# Altium PCB ControlBoard_PCB.PcbDoc (part 2 of 2)
Units mil, origin at the board's own origin, x right, y up, seen from the top; angles counter-clockwise.
Board outline 1629.92 x 1653.54 mil, 2 copper layers (Top Layer, Bottom Layer), stack 57 mil thick; 87 components, 76 nets, 349 pads, 144 vias.
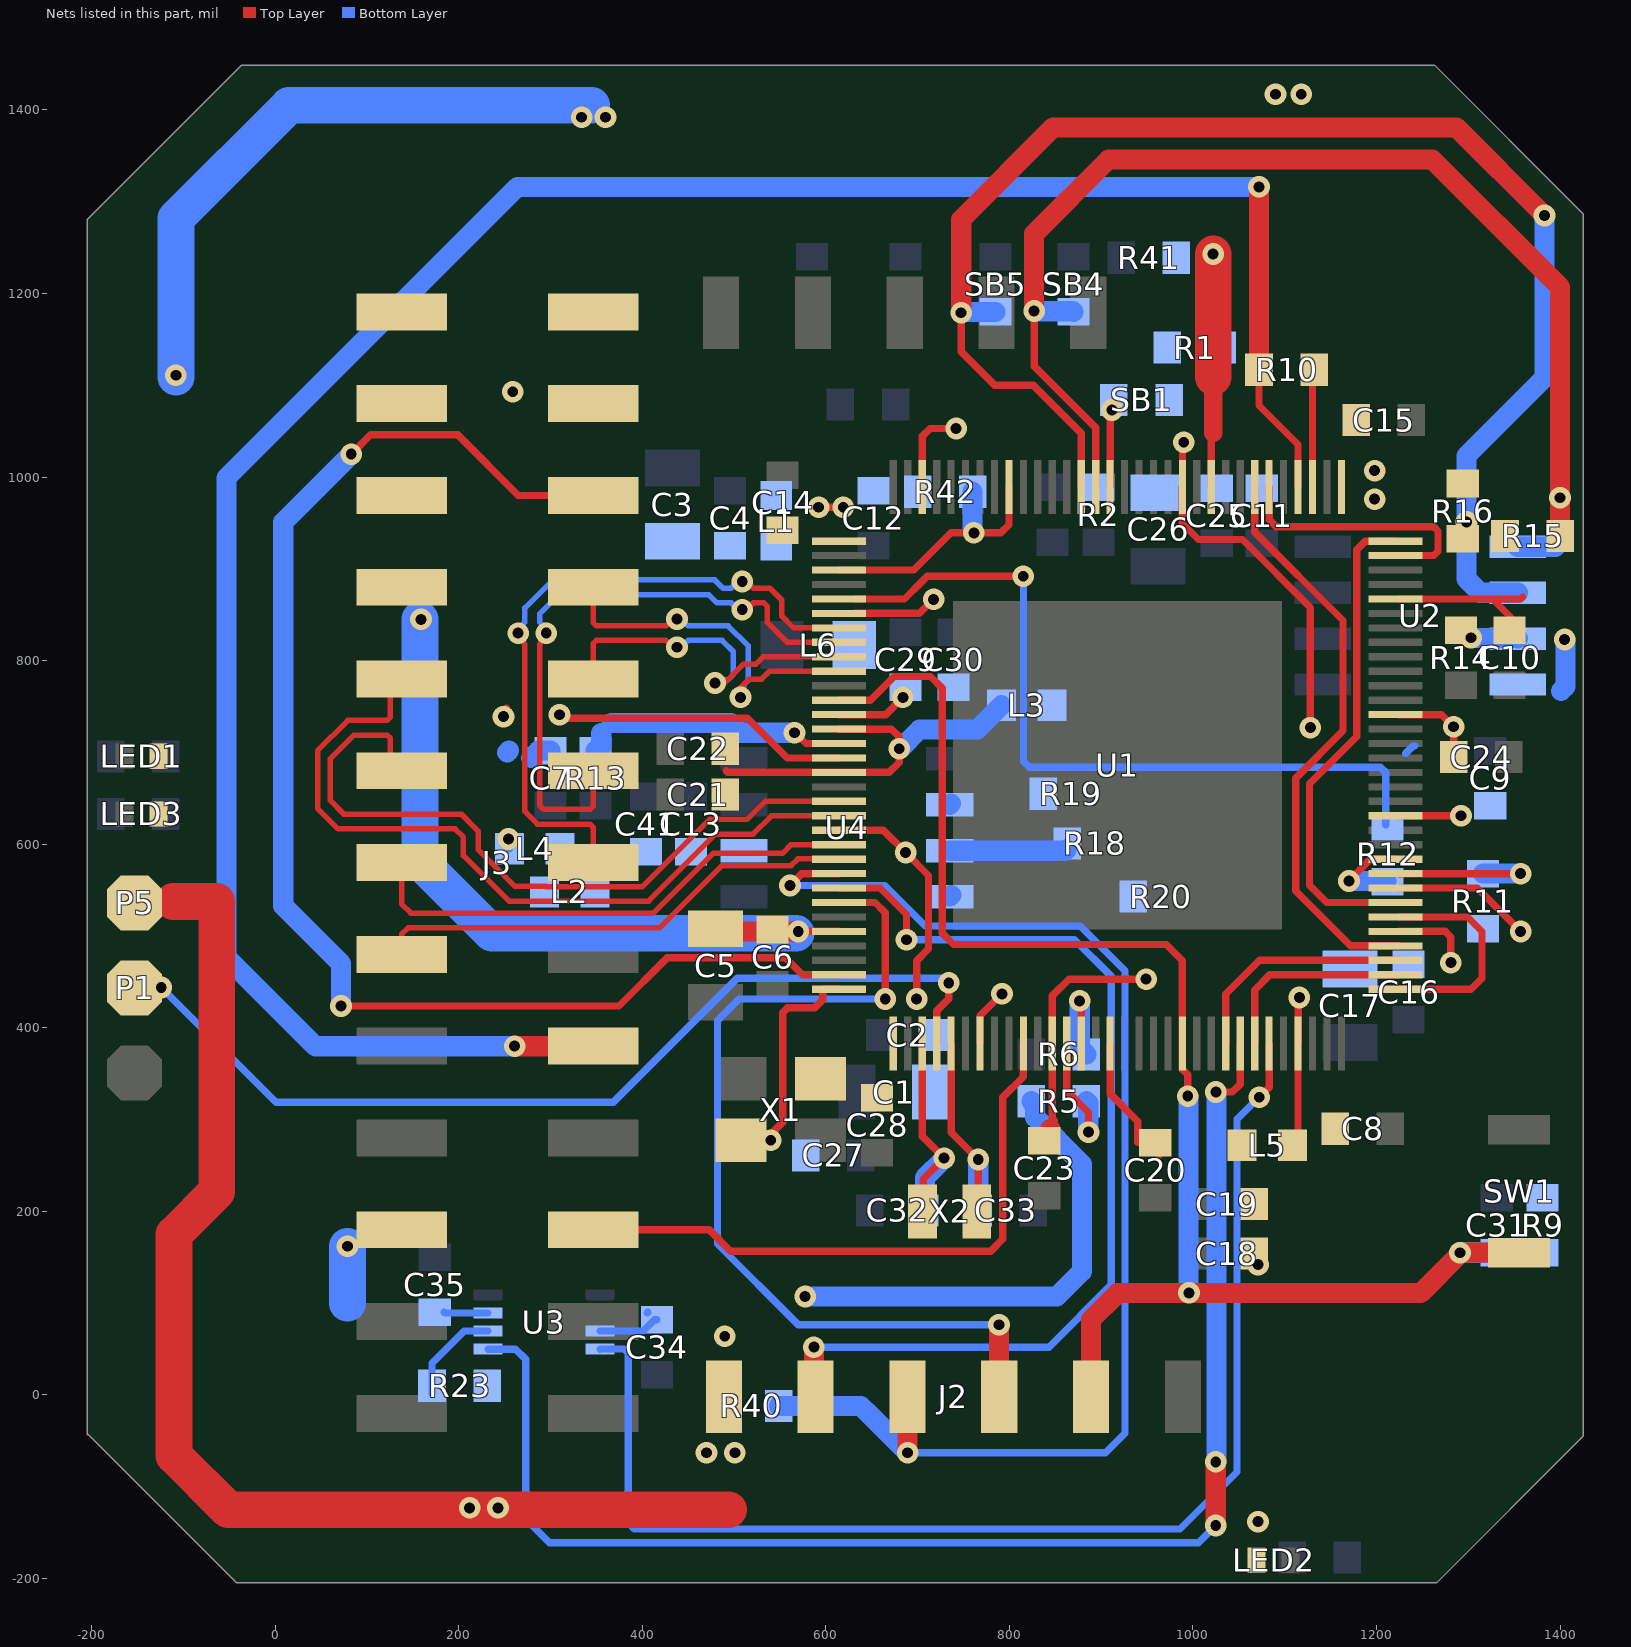
[diagram p2: the nets of this part, all layers, seen from the top]

## Via types
v1: diameter 23.62, hole 11.81, Top Layer to Bottom Layer, tented both sides, 131 vias
v2: diameter 23.62, hole 11.81, Top Layer to Bottom Layer, 9 vias
v3: diameter 125.98, hole 125.98, Top Layer to Bottom Layer, 4 vias

## Nets (pads, with @x,y where several pads share a name; then routed paths per layer and width w, separated by ;. In a path a pad name is that pad's centre, name@x,y a point inside that pad or via, vN(x,y) a via of type N, cw(c..) or ccw(c..) an arc to the next point about the centre after c; other vN are vias at no path point) (continued)
NetP1_1: P1.1 U1.4 | length 1068.6
  Top Layer w8: U1.4@720.82,382.97 720.82,418.57 734,431.76 v1(734,449)
  Top Layer w22: P1.1@-153,443.5 -152.5,444 v1(-124,444)
  Bottom Layer w8: v1(-124,444) 1,319 368.34,319 503.46,454.12 728.88,454.12 v1(734,449)
NetR1_2: R1.2 SB1.2
NetR2_2: R2.2 SB1.1 U1.81 | length 84.5
  Top Layer w8: U1.81@909.86,989.33 909.86,1071.09 v1(911.76,1073)
NetR5_2: R5.2 U1.13 | length 140.9
  Top Layer w8: U1.13@862.55,382.97 862.55,331.45 886.19,307.81 v1(886.19,286.38)
  Bottom Layer w22: R5.2@884,320 885.88,318.12 885.88,286.69 v1(886.19,286.38)
NetR6_2: R6.2 U1.14 | length 113.7
  Top Layer w8: v1@876.62,434.38 878.24,432.76 878.24,383.03 U1.14@878.3,382.97
  Bottom Layer w22: v1@876.7,429.3 v1(876.62,429.38) 876.62,378.38 R6.2@884,371
NetR11_2: R11.2 U1.40 | length 863.9
  Top Layer w8: U1.40@1224.76,552.26 1309.74,552.26 ; v1(1356.99,505) 1309.74,552.26 ; U1.40@1238.54,552.26 1309.74,552.26 ; U1.40@1238.54,552.26 1309.74,552.26 ; U1.40@1238.54,552.26 1309.74,552.26 ; U1.40@1238.54,552.26 1309.74,552.26 ; U1.40@1238.54,552.26 1309.74,552.26 ; U1.40@1238.54,552.26 1309.74,552.26 ; U1.40@1238.54,552.26 1309.74,552.26 ; U1.40@1238.54,552.26 1309.74,552.26 ; U1.40@1238.54,552.26 1309.74,552.26 ; U1.40@1238.54,552.26 1309.74,552.26
NetR12_2: R12.2 U1.42 | length 103.4
  Top Layer w8: v1(1170,560) 1170,560.55 1193.2,583.76 U1.42@1220.82,583.76
  Bottom Layer w8: R12.2@1211,560 R12.2@1212,559
  Bottom Layer w22: v1(1170,560) R12.2@1211,560
NetR13_2: R13.2 U1.111 | length 280.3
  Top Layer w8: v1(566,721.42) 566.82,721.42 578.5,709.74 U1.111@614.52,709.74
  Bottom Layer w22: R13.2@349,702 351.5,702 355.5,706 355.5,720.96 ; 366.54,732 496.84,732 507.42,721.42 v1(566,721.42)
NetR14_2: R14.2 U2.7 | length 51.4
  Bottom Layer w22: v1(1303,825) 1303.31,824.69 1353.31,824.69 U2.7@1354,824
NetR18_1: R18.1 U4.3 | length 127.4
  Bottom Layer w22: U4.3@735.01,593 861,593 R18.1@862,594
NetR19_1: R19.1 U4.2 | length 1.8
  Bottom Layer w22: U4.2@735.01,643 U4.2@736.25,644.24
NetR20_1: R20.1 U4.4 | length 2.5
  Bottom Layer w22: U4.4@735.01,543 U4.4@736.8,544.8
NetR23_2: R23.2 U3.6 | length 109.1
  Bottom Layer w8: R23.2@171,1 R23.2@171,10 171,34.55 206.08,69.63 U3.6@232,69.63
NetU1_39: U1.39 U1.64 | length 534.8
  Top Layer w8: U1.39@1220.82,536.51 1145.7,536.51 1127,555.21 1127,665.79 1178.54,717.33 1178.54,920.94 1187.75,930.15 U1.64@1220.82,930.21 U1.64@1220.82,930.21
NetU1_63: U1.63 U1.70 | length 290.9
  Top Layer w8: U1.70@1083.02,989.27 1083.02,953.72 1090.74,946 1262.31,946 1267,941.31 1267,919.21 1262.31,914.53 U1.63@1224.82,914.53
OPTO_IN: J3.6 U1.127 | length 1529.8
  Top Layer w8: v1(71.81,423.81) 374.81,423.81 427.47,476.47 556.08,476.47 574.72,457.83 614.46,457.83 U1.127@614.52,457.77 ; v1(83,1025) 104,1046 199,1046 265,980 J3.6@346.66,980
  Bottom Layer w22: v1(71.81,423.81) 71.81,470.19 9,533 9,951 v1(83,1025)
PHY_IRQn: R42.2 U1.88 U1.99 | length 292.1
  Top Layer w8: U1.99@614.52,898.72 695.98,898.72 736.49,939.23 v1(761.39,939.23) 790.79,939.23 799.56,948 U1.88@799.56,989.27
  Bottom Layer w22: R42.2@760,984 760,941.05 761.39,939.67 v1(761.39,939.23)
QSPI_CLK: R11.1 U1.41 | length 1357.8
  Top Layer w8: U1.41@1224.76,568.01 v1(1356.99,568.01) ; U1.41@1238.54,568.01 v1(1356.99,568.01) ; U1.41@1238.54,568.01 v1(1356.99,568.01) ; U1.41@1238.54,568.01 v1(1356.99,568.01) ; U1.41@1238.54,568.01 v1(1356.99,568.01) ; U1.41@1238.54,568.01 v1(1356.99,568.01) ; U1.41@1238.54,568.01 v1(1356.99,568.01) ; U1.41@1238.54,568.01 v1(1356.99,568.01) ; U1.41@1238.54,568.01 v1(1356.99,568.01) ; U1.41@1238.54,568.01 v1(1356.99,568.01) ; U1.41@1238.54,568.01 v1(1356.99,568.01)
  Bottom Layer w22: R11.1@1316,568 v1(1356.99,568.01)
QSPI_CS: R12.1 U1.101 | length 905
  Top Layer w8: v1(815.11,891.89) 710.36,891.89 705.66,887.19 685.69,867.22 ; 685.69,867.22 632.24,867.22 685.69,867.22
  Bottom Layer w8: v1(815.11,891.89) 815.5,891.5 815.5,690.44 821.94,684 1204.31,684 1210,678.31 R12.1@1210,621
QSPI_SIO0: U1.33 U1.38 | length 243
  Top Layer w8: U1.33@1224.76,442.02 1303.02,442.02 1315,454 1315,505 1299.24,520.76 U1.38@1224.76,520.76
QSPI_SIO1: U1.26 U1.34 | length 222.6
  Top Layer w8: U1.26@1067.28,382.97 1067.28,441.28 1083.77,457.77 U1.34@1220.82,457.77 U1.34@1224.76,457.77
QSPI_SIO2: U1.24 U1.35 | length 258
  Top Layer w8: U1.24@1035.78,382.97 1035.78,436.78 1072.52,473.52 U1.35@1220.82,473.52 U1.35@1224.76,473.52
QSPI_SIO3: U1.36 U1.71 | length 667
  Top Layer w8: U1.71@1067.34,961.31 1067.34,989.2 U1.71@1067.28,989.27 1067.28,939.94 1163.54,843.67 1163.54,723.54 1112,672 1112,549 1171.73,489.27 U1.36@1220.82,489.27 U1.36@1224.76,489.27
RST: C31.1 J2.5 R9.1 SW1.1 U1.21 U1.108 | length 1654.5
  Top Layer w8: U1.108@614.52,756.98 648.72,756.98 674.55,782.81 714.19,782.81 727,770 727,503 739.19,490.81 971.1,490.81 988.54,473.38 U1.21@988.54,382.97 988.54,355.04 994.38,349.19 v1(994.38,325.56)
  Top Layer w22: J2.5@889,-2 889,82 918,111 v1@995.62,111 ; v1(995.81,111.19) v1@995.62,111 ; v1@1291.5,154.5 1248,111 v1@995.62,111 ; v1@1292.1,155.1 SW1.1@1355.28,155.1
  Bottom Layer w22: v1(994.38,325.56) 995.19,324.74 995.19,111.81 v1(995.81,111.19) ; v1(1291,155) C31.1@1331,155
RXA_N: J3.14 U1.103 | length 740.8
  Top Layer w6: v2(264.88,830) 264.88,825.23 272.19,817.92 272.19,635.7 285.89,622 343.15,622 346.66,618.49 J3.14@346.66,580 ; v2(509,886.19) 513.77,886.19 521.08,878.88 539.16,878.88 552.05,865.99 552.05,848.58 564.9,835.72 U1.103@614.52,835.72
  Bottom Layer w6: v2(264.88,830) 264.88,834.77 272.19,842.08 272.19,857.44 302.75,888 479.07,888 488.19,878.88 496.92,878.88 504.23,886.19 v2(509,886.19)
RXA_P: J3.12 U1.104 | length 687.7
  Top Layer w6: v2(295.5,830) 295.5,825.23 288.19,817.92 288.19,642.33 292.51,638 343.15,638 346.66,641.51 J3.12@346.66,680 ; v2(509,855.57) 513.77,855.57 521.08,862.88 532.53,862.88 536.05,859.36 536.05,841.95 558.02,819.98 U1.104@614.52,819.98
  Bottom Layer w6: v2(295.5,830) 295.5,834.77 288.19,842.08 288.19,850.81 309.38,872 472.44,872 481.56,862.88 496.92,862.88 504.23,855.57 v2(509,855.57)
RXB_N: J3.15 U1.119 | length 534.7
  Top Layer w6: J3.15@138,480 138,502 144.98,508.98 286.36,508.98 ; 288.34,508.92 cw(c288.34,537.92) 286.37,508.99 ; U1.119@614.52,583.76 614.18,584.09 569.64,584.09 562.35,576.81 486.82,576.81 418.93,508.92 286.37,508.99
RXB_P: J3.13 U1.118 | length 556.6
  Top Layer w6: J3.13@138,580 138,535 148.08,524.92 412.31,524.92 477.38,590 552.92,590 562.42,599.5 U1.118@614.52,599.5
SCL_: R16.1 SB5.1 U1.83 U2.6 | length 1618.2
  Top Layer w8: v1(747.5,1179) 747.5,1136.5 784,1100 826,1100 878.36,1047.64 U1.83@878.36,989.33
  Top Layer w22: v1(747.5,1179) 747.5,1280.66 847.84,1381 1287,1381 v1(1383,1285)
  Bottom Layer w22: v1(747.5,1179) 748,1179 749,1180 SB5.1@785,1180 ; U2.6@1354,874 1313.09,874 1298,889.09 v1(1298,951) 1298,1023 1383,1108 v1(1383,1285)
SDA_: R15.1 SB4.1 U1.82 U2.5 | length 1378.5
  Top Layer w8: v1(827,1181) 827,1120.74 894.05,1053.69 U1.82@894.05,989.39
  Top Layer w22: v1(827,1181) 827,1265 908,1346 1260.84,1346 1400,1206.84 v1(1400,977.56) R15.1@1400,936
  Bottom Layer w22: v1(827,1181) 827.31,1180.69 869.31,1180.69 SB4.1@870,1180 ; U2.5@1354,924 1395,924 1400,929 v1(1400,977.56)
STEP: J3.22 U1.10 | length 683.7
  Top Layer w8: J3.22@346.66,180 473,180 496.27,156.73 779.73,156.73 793,170 793,324.21 815.24,346.46 815.24,382.91 U1.10@815.31,382.97
SWDCLK: J2.3 R40.2 U1.120 | length 1434.4
  Top Layer w8: v1(561,555) 574.01,568.01 U1.120@614.52,568.01 U1.120@614.58,568.07
  Top Layer w22: J2.3@689,-2 689.19,-2.19 v1(689.19,-62.99)
  Bottom Layer w8: v1(561,555) 664.26,555 708.26,511 877.21,511 926,462.21 926,-41.72 904.73,-62.99 v1(689.19,-62.99)
  Bottom Layer w22: R40.2@549,-12 638.19,-12 647.86,-21.67 680.35,-54.16 v1(689.19,-62.99)
SWDIO: J2.2 U1.121 | length 1095.3
  Top Layer w8: U1.121@614.52,552.26 659.11,552.26 688,523.37 v1(688,496)
  Top Layer w22: v1@587.34,52.12 587.34,-0.34 J2.2@589,-2
  Bottom Layer w8: v1(587.03,52.12) 843.18,52.12 911,119.94 911,456 871,496 v1(688,496)
SWO: J2.4 U1.122 | length 1004.4
  Top Layer w8: U1.122@614.52,536.51 653.64,536.51 664.86,525.29 v1(664.86,431.31)
  Top Layer w22: v1@788.9,76.38 788.9,-1.9 J2.4@789,-2
  Bottom Layer w8: v1@662.86,431.31 505.75,431.31 482,407.56 482,164.52 570.03,76.49 v1(788.79,76.49)
TXA_N: J3.10 U1.105 | length 399.4
  Top Layer w6: J3.10@346.66,780 346.66,818.49 350.18,822 425.92,822 433.23,814.69 v2(438,814.69) ; v2(479.33,775.67) 480.66,777 491,777 509.87,795.87 523.51,795.87 532,804.35 614.39,804.35 U1.105@614.52,804.23
  Bottom Layer w6: v2(438,814.69) 442.77,814.69 450.08,822 487,822 499.31,809.69 499.31,794.93 499.34,785.09 493.29,779.04 482.7,779.04 v2(479.33,775.67)
TXA_P: J3.8 U1.106 | length 412.7
  Top Layer w6: J3.8@346.66,880 346.66,841.51 350.18,838 425.92,838 433.23,845.31 v2(438,845.31) ; v2(507.07,760) 507.07,760.93 502.31,765.69 516.5,779.87 530.14,779.87 538.75,788.48 U1.106@614.52,788.48
  Bottom Layer w6: v2(438,845.31) 442.77,845.31 450.08,838 493.63,838 515.31,816.31 515.31,801.55 ; v2(507.07,760) 510.44,763.37 510.44,773.57 515.34,778.47 515.34,801.53
TXB_N: J3.11 U1.115 | length 807.2
  Top Layer w6: J3.11@138,680 125.69,692.31 125.69,715.49 122.17,719 86,719 60,693 60,648 75.31,632.69 202.94,632.69 221.31,614.31 221.31,594.31 261.64,553.99 294.9,553.99 294.96,553.92 400.29,553.92 473.37,627 514.14,627 533.89,646.75 U1.115@614.52,646.75
TXB_P: J3.9 U1.116 | length 864.4
  Top Layer w6: J3.9@138,780 125.69,767.69 125.69,738.51 122.17,735 79.37,735 46.31,701.94 46.31,639.06 68.69,616.69 196.31,616.69 205.31,607.69 205.31,587.69 255.01,537.99 304.02,537.99 304.08,537.92 406.92,537.92 480,611 520.77,611 540.77,631 U1.116@614.52,631
UART_IO: J3.18 R10.2 U1.68 | length 2562.5
  Top Layer w8: R10.2@1072,1117 1072,1078 1114.52,1035.48 U1.68@1114.52,989.27
  Top Layer w22: v1(261,380) J3.18@346.66,380 ; R10.2@1072,1117 v1(1072,1316.19)
  Bottom Layer w22: v1(261,380) 44,380 -53,477 -53,999 264,1316 v1@1071.81,1316
UART_IO#: R10.1 U1.67 | length 128.4
  Top Layer w8: U1.67@1130.27,989.27 1130.27,1115.27 R10.1@1132,1117
UART_RX: U1.27 U3.4 | length 1390.8
  Top Layer w8: v1(1072.19,324.42) 1083.02,335.26 U1.27@1083.02,382.97
  Bottom Layer w8: U3.4@354.05,49.94 U3.4@354.05,49.94 380.31,50 385,45.31 385,-139.56 391.44,-146 986,-146 1048,-84 1048,300.48 1071.94,324.42 v1(1072.19,324.42)
UART_TX: U1.25 U3.5 | length 1537.2
  Top Layer w8: v1(1025,330) 1043,330 1051.53,338.53 U1.25@1051.53,382.97
  Top Layer w22: v1(1024.87,-142.21) v1(1024.87,-72.87)
  Bottom Layer w8: U3.5@232,49.94 262.06,49.94 273,39 273,-135 299,-161 1006.08,-161 v1(1024.87,-142.21)
  Bottom Layer w22: v1(1024.87,-72.87) 1025.62,-72.12 1025.62,329.38 v1(1025,330)
VCC_3V3: C1.1 C2.1 C8.1 C9.1 C10.1 C11.1 C12.1 C13.1 C14.1 C15.1 C16.1 C17.1 C18.1 C34.1 C41.1 J2.1 J3.2 J3.4 L1.1 L2.1 L4.1 L5.1 LED1.1 LED2.1 LED3.1 P5.1 R1.1 R5.1 R9.2 R15.2 R16.2 R23.1 R40.1 R41.2 R42.1 U1.7 U1.29 U1.37 U1.45 U1.60 U1.65 U1.74 U1.94 U1.97 U1.117 U2.8 U3.3 U4.6 | length 3808.5
  Top Layer w8: v1(592.19,967.19) v1(619,967.19) v1@619,971 ; U1.117@614.52,615.25 662.75,615.25 v1(687,591) 712,566 712,486 699,473 v1(699,431.31) ; U1.94@705.07,989.27 705.07,1044.31 713.76,1053 v1(742,1053) ; U1.7@768.06,382.97 768.06,413.06 v1(792,437) ; U1.74@1020.03,989.27 1020.03,1046.03 1022,1048 ; v1@1067,-141 v1@1067,-139 ; L5.1@1108.56,272 1114.52,277.96 U1.29@1114.52,382.97 1114.58,383.03 1114.58,431.58 v1(1116,433) v1@1116.49,432.51 ; U1.37@1224.76,505.02 1274.98,505.02 1281,499 v1(1281,471) ; U1.45@1224.76,631 v1(1292,631) ; U1.60@1224.76,867.22 1357.22,867.22 1359,869 ; 1328.5,865 C10.1@1346,847.5
  Top Layer w20: 1022,1048 1022,1109
  Top Layer w40: -111,537.5 -63.5,537.5 -63.5,221.5 -110,175 -110,-66 -51,-125 494,-125 ; 1022,1109 v1(1022,1243)
  Bottom Layer w8: U3.3@354.05,69.63 401.13,69.63 413.5,82 C34.1@416,82 ; C34.1@405.37,89.32 C34.1@406,89.94
  Bottom Layer w22: R40.1@488.5,-18.5 R40.1@490,-20 ; v1(577.51,107.28) 851.74,107.28 879.13,134.68 879.13,251.28 828,302.41 828,316 R5.1@824,320 ; 1401,767 1406,772 1406,822 v1(1405,823)
  Bottom Layer w40: v1@-108,1109 v1(-108,1111) -108,1282 15,1405 345,1405
  other v1: 1071,-138 212,-123 243,-123 470,-63 501,-63 490,64 1071,142 1198,976 1198,1007 334,1392 360,1392 1090,1417 1118,1417
VDD12: C21.1 C22.1 L3.2 U1.110 U1.113 | length 421.8
  Top Layer w8: 491.5,680 493.26,678.24 U1.113@614.52,678.24 614.58,678.31 669.31,678.31 680,689 v1(680,704) 680,717 671.57,725.43 614.58,725.43 U1.110@614.52,725.49
  Bottom Layer w22: v1(680,704) 681.16,704 702.16,725 765,725 L3.2@791.44,751.44
VDD_5V: C35.1 J3.21 U3.7 | length 110.3
  Bottom Layer w8: C35.1@184,89.94 184.63,89.32 U3.7@232,89.31
  Bottom Layer w40: 79,100 v1(79,162)
VDD_CORE: C29.1 C30.1 L6.2 U1.109 | length 77.3
  Top Layer w8: U1.109@614.52,741.24 665.24,741.24 v1(684,760)
VDD_CR: C23.1 C24.1 C25.1 C26.1 L3.1 U1.12 U1.52 U1.76 | length 772.4
  Top Layer w8: 848.8,299 846.8,301 U1.12@846.8,382.97 846.8,434.8 865,453 v1(949,453) ; v1@990.5,1037.5 v1(990,1038) 988.6,1036.6 988.6,989.33 U1.76@988.54,989.27 988.54,949.46 1006,932 1054,932 1128,858 v1(1128,727) ; U1.52@1224.76,741.24 1270.76,741.24 v1(1284,728) C24.1@1284,695
  Top Layer w22: C23.1@838,277 840.5,277 844.5,281 C23.1@844.5,289.62
  Bottom Layer w8: 1232,699 1240,707 1242,707
VDDANA: C19.1 C20.1 L5.2 U1.16 | length 147.7
  Top Layer w8: U1.16@909.8,382.97 909.8,328.2 940,298 940,275 ; C20.1@953.69,284.31 963,275 C20.1@963,261
VDDBIAS: C7.1 L4.2 U1.112 | length 367.7
  Top Layer w8: v1(249,739) 249,745.19 v1@251.81,748 ; v1@255,601.23 v1@255.44,600.79 ; v1(310,741) 313.81,737.19 514.81,737.19 558.01,693.99 U1.112@614.52,693.99
  Bottom Layer w8: L4.2@255.44,595 L4.2@255.44,600.79
  Bottom Layer w22: 253,700 255,702 ; 279,694 287,702 C7.1@300,702
  other v1: 254.44,605.79
VDDTXRX1: C3.1 C4.1 J3.1 J3.3 L1.2 U1.102 | length 91.7
  Top Layer w8: U1.102@632.24,851.47 702.2,851.47 v1(717.54,866.81)
  other v1: 259,1093
VDDTXRX2: C5.1 C6.1 J3.5 J3.7 L2.2 U1.124 | length 847.8
  Top Layer w8: v1(570.02,505.02) U1.124@614.52,505.02
  Top Layer w22: C5.1@474,508 476.98,505.02 v1(570.02,505.02)
  Bottom Layer w40: v1@158,845 158,581.43 236.43,503 v1@568,503
  other v1: 159,845
XIN32: C32.2 U1.3 X2.1 | length 268.4
  Top Layer w8: U1.3@705.07,382.97 705.07,281.97 v1(729,258.04) 706.29,235.33 706.29,200.82 X2.1@705.47,200
  Bottom Layer w22: C32.2@708,201 708,236.6 729,257.6 v1(729,258.04)
XOUT32: C33.2 U1.5 X2.2 | length 249.7
  Top Layer w8: U1.5@736.57,382.97 736.57,285.98 v1(766.09,256.45) X2.2@766.09,200
  Bottom Layer w22: C33.2@766,202 766.05,202.05 766.05,256.41 v1(766.09,256.45)
XTAL_IN: C27.2 U1.128 X1.1 | length 255.3
  Top Layer w8: X1.1@507.69,277.54 v1(540,277.54) 540,284 553,297 553,416.44 558.56,422 588,422 596.71,430.71 596.71,441.96 596.77,442.02 U1.128@614.52,442.02
XTAL_OUT: C28.2 U1.1 X1.3
pads on no net: U1.8 U1.9 U1.18 U1.19 U1.20 U1.22 U1.23 U1.28 U1.30 U1.31 U1.32 U1.48 U1.49 U1.50 U1.51 U1.53 U1.54 U1.55 U1.56 U1.57 U1.58 U1.59 U1.61 U1.62 U1.66 U1.69 U1.72 U1.73 U1.75 U1.77 U1.78 U1.79 U1.80 U1.84 U1.85 U1.86 U1.87 U1.91 U1.92 U1.93 U1.96 U1.100 U1.107 U1.123 U1.125 U1.126 U4.1 U4.5 U4.8

## Polygon pours and split planes (outlines as drawn)
GND on Bottom Layer "Polygon_2" (hatched 45Degree grid 25 track 15, remove dead copper, pour order 1): -33.5,1344.5 -37.1,1352.9 1265.1,1352.9 1330,1288 1330,-45 1266,-109 -43,-109 -110.5,-41.5 -110.5,1282 -108,1282 -37.1,1352.9
GND on Top Layer "Polygon_1" (hatched 45Degree grid 25 track 15, remove dead copper, pour order 2): -33.5,1344.5 -37.1,1352.9 1265.1,1352.9 1330,1288 1330,-45 1266,-109 -43,-109 -110.5,-41.5 -110.5,1282 -108,1282 -37.1,1352.9

## Other copper
Top Layer:
  rectangle net VDDBIAS: 238,592 262,767
  rectangle net NetP1_1: -183,404 -110.5,476
  rectangle net VCC_3V3: 452.8,82.68 593,122.05
  rectangle net VCC_3V3: -137,657 -82,1285
  rectangle net GND: -65,1218 283,1285
  rectangle net GND: -65,820 64,1260
  rectangle net VDDTXRX1: 89,1057 282,1203
  rectangle net #UART_RX: 258.66,-87 428.66,28
  rectangle net #UART_TX: 258.66,37 428.66,128
  rectangle net VDD_5V: 50,137 220,228
  rectangle net DIAG: 50,237 220,328
  rectangle net LINK1: 50,337 220,402
  rectangle net XTAL_IN: 581,418 644,445
  rectangle net VDDTXRX2: 87,824 198,1000
  rectangle net VCC_3V3: 292,1058 443,1407
  rectangle net GND: 567,249 674,301
  rectangle net VCC_3V3: -137,517 -44,714
  rectangle net VCC_3V3: -199,497 -44,578
  rectangle net GND: -63,-70 220,128
  rectangle net VCC_3V3: 1346,807 1417,896
  rectangle net NetR14_2: 1273,809 1314,850
  rectangle net GND: 1270,754 1413,790
  rectangle net VCC_3V3: 1323,861 1369,985
  rectangle net GND: 1327,632 1413,783
  rectangle net GND: 1378,281 1412,672
  rectangle net VDD12: 473,637 510,723
  rectangle net VCC_3V3: 1276,970 1369,1109
  rectangle net VCC_3V3: 1177,1095 1369,1142
  rectangle net GND: 1327,632 1372,760
  rectangle net GND: 529,431 552,465
  rectangle net XTAL_IN: 480,252 557,301
  rectangle net GND: 478,318 539,358
  rectangle net GND: 435,317 542,465
  rectangle net VCC_3V3: 453,-145 517,104
  rectangle net NetLED1_2: -199,671 -150,744
  rectangle net NetLED3_2: -199,585 -150,658
  rectangle net VCC_3V3: 1050,-198 1085,-124
  rectangle net GND: 1223,957 1269,1085
  rectangle net GND: 504,986 551,1104
  rectangle net GND: 459,1096 551,1237
  rectangle net GND: 504,986 660,1126
  rectangle net VCC_3V3: 410,926 495,1080
  rectangle net GND: 931,-54 1295,90
  rectangle net GND: 413,635 454,722
  rectangle net GND: 1198,196 1412,308
  rectangle net VDDANA: 1040,186 1084,258
  rectangle net VCC_3V3: 1091,129 1182,308
  rectangle net VDD_CR: 819,257 860,305
  rectangle net VCC_3V3: 438,926 644,979
  rectangle net VCC_3V3: 1159,957 1216,1142
  rectangle net VCC_3V3: 1323,807 1369,888
  rectangle net SCL_: 1278,907 1314,962
  rectangle net GND: 820,130 1024,237
  rectangle net VCC_3V3: 1033,129 1106,175
  rectangle net VDDANA: 936,249 1084,302
  rectangle net XTAL_OUT: 567,309 677,411
Bottom Layer:
  rectangle net VDDTXRX1: 593,869 621,942
  rectangle net VDD_CORE: 607,744 756,802
  rectangle net GND: 824,914 913,947
  rectangle net NetR2_2: 894,1062 937,1109
  rectangle net VDDTXRX1: 593,854 730,881
  rectangle net NetR6_2: 854,350 899,395.54
  rectangle net GND: -141,620 -101,652
  rectangle net NetR13_2: 329,683 374,743
  rectangle net VDDBIAS: 238,683 321,761
  rectangle net GND: 248,1200 524,1250
  rectangle net VDDTXRX1: 306,905 621,942
  rectangle net GND: 1169.81,-81 1306,82
  rectangle net RST: 1278,128 1400,172
  rectangle net GND: 1156,1095 1289,1323
  rectangle net NetR19_1: 708,640 853,673
  rectangle net VDD_CR: 826.5,713 1059,792
  rectangle net VDDTXRX2: 256,502 309,565
  rectangle net GND: 190,626 566,673
  rectangle net LINK0: 661,1030 700,1097
  rectangle net VCC_3V3: 684,296 716,442
  rectangle net GND: 1240,748 1308,800
  rectangle net VCC_3V3: 318,1373 1145,1436
  rectangle net GND: 668,810 801,846
  rectangle net VDD_CORE: 606.92,774 658,844
  rectangle net NetL6_1: 527.76,790 598,845
  rectangle net VCC_3V3: 197,-199 1075,-173
  rectangle net VDD_CR: 937,402 1076,507
  rectangle net VDD_CR: 937,492 1265,517.53
  rectangle net VDD_CR: 1237.37,503.47 1265,697
  rectangle net NetR20_1: 709,529 950,557
  rectangle net VCC_3V3: 1091,1243 1145,1428
  rectangle net VCC_3V3: 717,1025 801,1091
  rectangle net VDD_CR: 826.5,695 1299,741
  rectangle net GND: 1306,669 1370,717
  rectangle net VCC_3V3: 1274,598 1393,662
  rectangle net NetR19_1: 708,629 853,658
  rectangle net NetR18_1: 708,579 879,619
  rectangle net GND: 834,822 1279,947
  rectangle net VCC_3V3: 332,530 469,602
  rectangle net GND: 501,316 627,411
  rectangle net GND: 669,130 825,176
  rectangle net GND: 613,130 677,411
  rectangle net GND: 808,130 849,239
  rectangle net GND: 1121,-54 1266,381
  rectangle net VCC_3V3: 708,998 737,1091
  rectangle net VCC_3V3: 753,385 802,448
  rectangle net XTAL_IN: 524,242 597,299
  rectangle net VCC_3V3: 197,-197 258,33
  rectangle net VCC_3V3: 453,-76 514,77
  rectangle net GND: 426,-135 979,-84
  rectangle net GND: 396,-135 441,46
  rectangle net GND: 291,132 421,151
  rectangle net GND: 141,133 421,234
  rectangle net VDD_5V: 59,74 191.63,126
  rectangle net LINK0: 531,1136 605.75,1195
  rectangle net NetLED3_2: -199,581.72 -151,657.72
  rectangle net NetLED1_2: -199,671 -151,747
  rectangle net VCC_3V3: 1084,402 1132,458
  rectangle net VCC_3V3: 1358,184 1393,479
  rectangle net VCC_3V3: 1084,443 1405,485
  rectangle net VCC_3V3: 1380,184 1417,754
  rectangle net VCC_3V3: 1059,-199 1085,174
  rectangle net GND: 1223,884 1279,1323
  rectangle net GND: 598,1059 643,1122
  rectangle net VDDTXRX1: 246,905 373,1110
  rectangle net GND: 389,970 516,1157
  rectangle net VCC_3V3: 773,297 838.94,342
  rectangle net VCC_3V3: 693,297 802,423
  rectangle net VCC_3V3: 281,574 699,612
  rectangle net GND: 1100,748 1279,855
  rectangle net VCC_3V3: 1320,741 1417,786
  rectangle net GND: 1140,184 1351,436
  rectangle net VCC_3V3: 396,58 514,106.3
  rectangle net GND: 383,666 476,714
  rectangle net LINK1: 685,1107 781,1154
  rectangle net LINK1: 664,1107 709,1195
  rectangle net VCC_3V3: 1058,959 1145,1177
  rectangle net VCC_3V3: 960,1220 1135,1295
  rectangle net VCC_3V3: 1010,1121 1145,1292
  region net NetR1_2: 1003,1065 1003,1165 950,1165 950,1065
  rectangle net VDD_CR: 930,959 1045,1049
  rectangle net VCC_3V3: 1058,959 1216,1023
  rectangle net NetR2_2: 876,959 922,1109
  rectangle net NetJ1_1: 847,1218 944,1295
  rectangle net NetJ1_2: 762,1225 807,1295
  rectangle net NetJ1_3: 664,1225 709,1295
  rectangle net NetJ1_4: 562,1225 607,1295
  rectangle net VCC_3V3: 524,955 737,1019
  rectangle net NetR11_2: 1298,492 1372,530

## Silkscreen, mask and mechanical layers (free items; w line width, h text height)
Top Overlay:
  lines w5: 1134,259 1205,259 1221,243 ; 1165.9,259 1169,259
  text "JTAG" at 940,1373 h55
  text "INTERFACING HEADER" at 68,1235 h55
  text "#" at 568,1070 h60 r180
  text "#" at 1120,1044 h60
  text "# >> 0.1uF" at -138,916 h80 r90
  text "#" at 1405,798 h60 r180
  text "#" at 506,774 h60 r180
  text "#" at 1374,674 h60
  text "#" at 506,623 h60 r180
  text "VCC_3V3" at -114,503 h50
  text "NetP1_1" at -114,410.5 h50
  text "#" at 524,380 h60
  text "GND" at -114,318 h50
  text "#" at 1272,310 h60 r180
  text "#" at 824,150 h60
  text "#" at 945,148 h60
  text "SW HEADER" at -10,-191 h55
Bottom Overlay:
  text "#" at 480,1054 h60 r180
  text "#" at 1022,899 h60 r180
  text "#" at 1063,899 h60 r180
  text "#" at 638,897 h60 r180
  text "#" at 799,799 h60
  text "#" at 439,722 h60 r180
  text "#" at 269,627 h60
  text "#" at 1385,627 h60
  text "#" at 413,525 h60
  text "#" at 601,414 h60 r180
  text "#" at 1248,339 h60
  text "#" at 1317,127 h60 r180
  text "#" at 474,97 h60 r180
  text "# >> 0.1uF" at 615,-190 h80
Mechanical 2:
  lines w10: -204.72,-41.8 -204.72,1280.28 ; -204.72,-41.8 -203.18,-43.35 -41.8,-204.72 ; -204.72,-41.8 -204.72,1280.28 ; -204.72,1280.28 -36.18,1448.82 ; -41.8,-204.72 1265.28,-204.72 ; -41.8,-204.72 1265.28,-204.72 ; -36.18,1448.82 1263.11,1448.82 ; -36.18,1448.82 1263.11,1448.82 ; 1263.11,1448.82 1425.2,1286.73 ; 1265.28,-204.72 1425.2,-44.8 ; 1425.2,-44.8 1425.2,1286.73 ; 1425.2,-44.8 1425.2,1286.73

## Dimensions
-36.18,1448.82 to -41.8,-204.72 on Mechanical 1
1425.2,1286.73 to -204.72,1280.28 on Mechanical 1